# Altium PCB NMEA2K-Converter-v1.0.PcbDoc (part 3 of 4)
Units mil, origin at the board's own origin, x right, y up, seen from the top; angles counter-clockwise.
Board outline 1771.65 x 1968.5 mil, 4 copper layers (Top Layer, Layer 1, Layer 2, Bottom Layer), stack 62.45 mil thick; 138 components, 82 nets, 467 pads, 178 vias.
Unrouted connection lines stored in the file: 6.
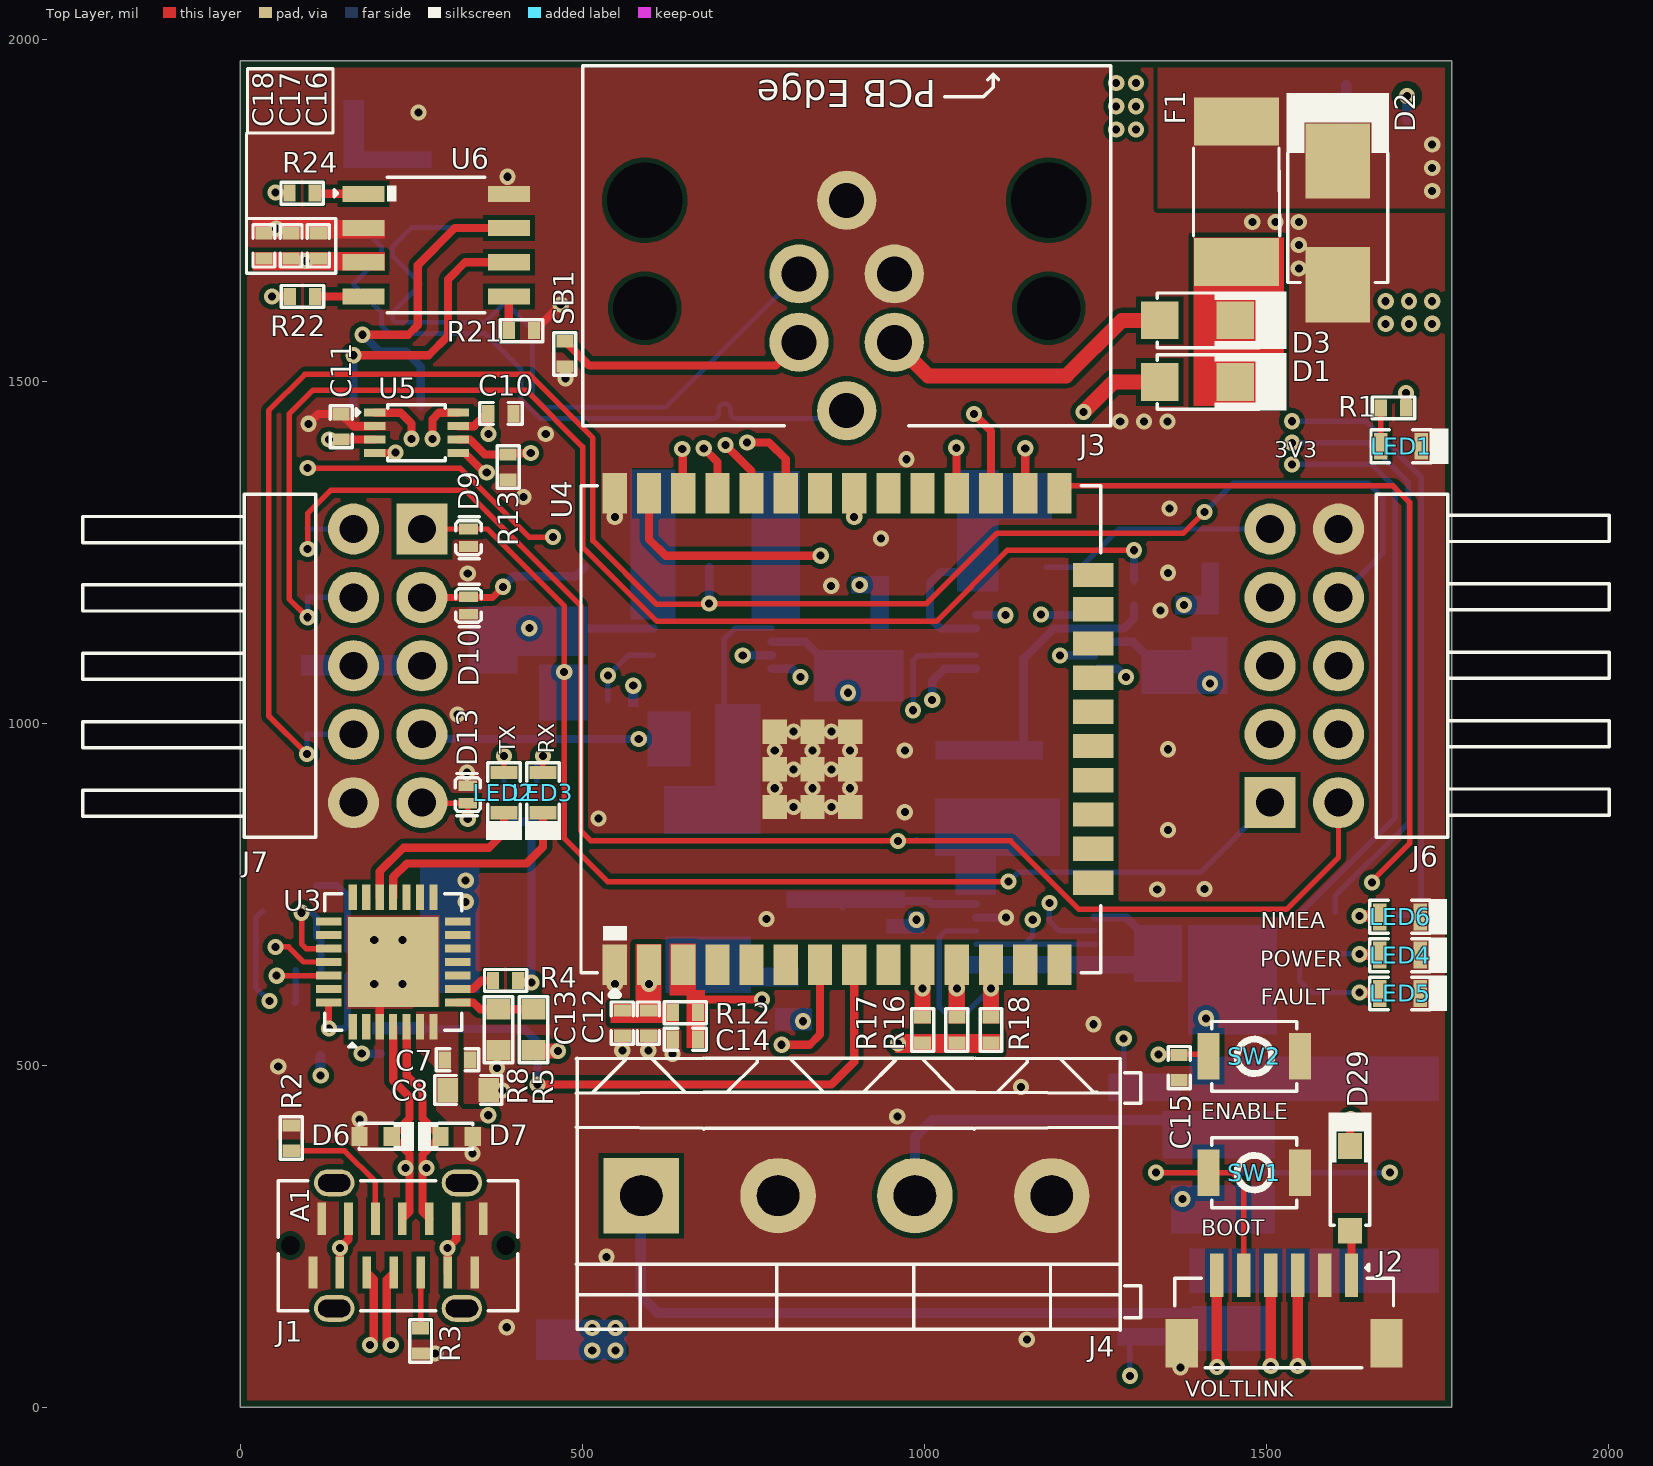
[diagram p0: Top Layer view]

## Part data (continued)
U9 U12: "IC REG LIN POS ADJ 500MA SOT223", Case/Package=SOT-223-4, LCSC Part Number=C840113, Manufacturer="Texas Instruments", Max Operating Temperature=125°C, Max Output current=500mA, Max Output Voltage=37V, Max Supply Voltage=40V, Min Input Voltage=4.2V, Min Operating Temperature=-40°C, Min Output Voltage=1.25V, Package Quantity=1, Power Supply Rejection Ratio (PSRR)=80dB, Quiescent Current=3.5mA, Reference Voltage=1.3V, Supplier Part Number=595-LM317MDCYR, Category="Voltage Regulators - Linear", ComponentLink1Description=https://datasheet.ciiva.com/1643/755612-1643356.pdf?src-supplier=Newark, ComponentLink1URL=https://datasheet.ciiva.com/1643/755612-1643356.pdf?src-supplier=Newark, ComponentLink2Description=https://datasheet.ciiva.com/41458/001014040-da-01-en-ic-reg-adj-0-5-lm317mdcyr-sot-223-4-tid-41458215.pdf?src-supplier=Conrad, ComponentLink2URL=https://datasheet.ciiva.com/41458/001014040-da-01-en-ic-reg-adj-0-5-lm317mdcyr-sot-223-4-tid-41458215.pdf?src-supplier=Conrad, ComponentLink3Description=https://datasheet.ciiva.com/1512/1814942-1512040.pdf?src-supplier=Element14, ComponentLink3URL=https://datasheet.ciiva.com/1512/1814942-1512040.pdf?src-supplier=Element14, ComponentLink4Description=https://datasheet.ciiva.com/46398/755612-46398903.pdf?src-supplier=Element14, ComponentLink4URL=https://datasheet.ciiva.com/46398/755612-46398903.pdf?src-supplier=Element14, ComponentLink5Description=https://datasheet.ciiva.com/46419/1814942-46419370.pdf?src-supplier=Element14, ComponentLink5URL=https://datasheet.ciiva.com/46419/1814942-46419370.pdf?src-supplier=Element14, ComponentLink6Description=https://datasheet.ciiva.com/2042/lm317m-2042100.pdf?src-supplier=Digikey, ComponentLink6URL=https://datasheet.ciiva.com/2042/lm317m-2042100.pdf?src-supplier=Digikey, ComponentLink7Description=https://datasheet.ciiva.com/2042/lm317m-2042099.pdf?src-supplier=Digikey, ComponentLink7URL=https://datasheet.ciiva.com/2042/lm317m-2042099.pdf?src-supplier=Digikey, ComponentLink8Description=https://datasheet.ciiva.com/2042/lm317m-2042101.pdf?src-supplier=Digikey, ComponentLink8URL=https://datasheet.ciiva.com/2042/lm317m-2042101.pdf?src-supplier=Digikey, ComponentLink9Description=https://datasheet.ciiva.com/14280/lm317mq-14280776.pdf?src-supplier=Avnet, ComponentLink9URL=https://datasheet.ciiva.com/14280/lm317mq-14280776.pdf?src-supplier=Avnet, Item Type=IC, Lead Free="Lead Free", Manufacturer Part Number=LM317MDCYR, Mounting Technology="Surface Mount", Number of Outputs=1, Number of Regulators=1, Output Current=500mA, Output Type=Adjustable, Output Voltage=37V, Packaging="Tape and Reel", Pins=4, Polarity=Positive, Pricing="1=0.67, 10=0.564, 50=0.564, 100=0.428, 500=0.359, 1000=0.283, 2500=0.263, 5000=0.245, 10000=0.236, 25000=0.227 (USD)", Radiation Hardening=No, Reach SVHC Compliant=No, RoHS=Yes, RoHS Compliant=Yes, Series=-, Stock=12890, Supplier=Mouser, Weight=0.006632oz
U11: "SOP-8 Logic Output Optoisolators ROHS", LCSC Part Number=C5123515, Manufacturer=UMW, Package=SOP-8, ComponentLink1Description=LCSC, ComponentLink1URL=https://www.lcsc.com/product-detail/Logic-Output-Optoisolators_UMW-Youtai-Semiconductor-Co-Ltd-6N137S_C5123515.html, Item Type=Optoisolators, Manufacturer Part Number=6N137S

## Via types
v1: diameter 23.62, hole 11.81, Top Layer to Bottom Layer, tented both sides, 178 vias

## Nets (pads, with @x,y where several pads share a name; then routed paths per layer and width w, separated by ;. In a path a pad name is that pad's centre, name@x,y a point inside that pad or via, vN(x,y) a via of type N, cw(c..) or ccw(c..) an arc to the next point about the centre after c; other vN are vias at no path point)
3V3: C3.2 C7.1 C8.2 C11.2 C12.2 C13.2 C16.2 C17.1 C18.2 D29.2 R1.1 R4.1 R6.2 R9.2 R12.2 R16.1 R17.1 R18.1 R30.1 U2.2 U2.4 U3.6 U3.7 U4.2 U5.3 U6.3 | length 2255.6
  Top Layer w12: v1@130.29,1414.41 U5.3@196.78,1414.41 ; R4.1@406.87,623.68 408.41,622.14 424.34,622.14 v1(425.87,620.61) ; D29.2@1622.87,381.69 1622.87,419.68 v1(1623.87,420.68) ; R1.1@1704.82,1460.73 v1(1704.82,1482.73)
  Layer 2 w22: v1(130.29,1414.68) 130.29,1641.26 v1(95.87,1675.68) 95.87,1773.68 180.87,1858.68 1221.87,1858.68 1360.87,1719.68 1422.87,1719.68
  Bottom Layer w12: v1(177.87,516.68) R30.1@205.87,516.68 ; R6.2@385.87,855.68 R9.2@433.87,855.68 425.87,847.68 v1(425.87,620.61)
  other v1: 362.87,426.68 961.87,531.68 597.87,618.53 1674.87,1583.68 1708.87,1583.68 1742.87,1583.68 1674.87,1616.68 1708.87,1616.68 1742.87,1616.68
5V: C4.2 C5.2 C6.2 C10.2 C24.1 C27.1 C30.1 D4.2 FB1.2 FB2.2 FB3.2 L1.2 U1.1 U2.3 U5.7 U9.3 U11.7 U11.8 U12.3 | length 116
  Top Layer w12: U5.7@318.87,1434.05 342.24,1434.05 C10.2@360.87,1452.68 ; v1@362.87,1422.72 C10.2@362.87,1452.68 ; v1@362.92,1422.72 362.92,1422.61 363.03,1422.61 363.03,1422.56 v1@363.08,1422.56
  Bottom Layer w15: v1(1705.87,1916.68) 1706.12,1916.68 U1.1@1706.12,1881.08
  other v1: 514.87,82.68 548.87,82.68 514.87,115.68 548.87,115.68 1377.97,304.3 1412.41,568.35 329.87,738.68 329.87,769.68 1379.87,1172.68 905.87,1201.68 363.14,1422.5 1280.87,1867.68 1309.87,1867.68 1280.87,1901.68 1309.87,1901.68 1280.87,1935.68 1309.87,1935.68
12V_BATT: D15.2 J6.5 J6.6 J7.5 J7.6 R40.2
  other v1: 988.87,712.49
ACT-LED: R20.2 U4.31 | length 1678.6
  Layer 2 w8: v1(897.87,1301.19) 978.18,1301.19 1215.66,1538.68 1393.87,1538.68 1491.28,1441.28 v1(1537.87,1441.28)
  Bottom Layer w8: v1(1537.87,1441.28) 1645.27,1441.28 1726.87,1359.68 1726.87,727.68 1717.87,718.68 R20.2@1685.53,718.68